# Altium PCB Audio-Player-v1.1.PcbDoc (part 1 of 3)
Units mil, origin at the board's own origin, x right, y up, seen from the top; angles counter-clockwise.
Board outline 4527.56 x 1574.8 mil, 4 copper layers (Top Layer, Ground, Power, Bottom Layer), stack 62.449 mil thick; 107 components, 72 nets, 372 pads, 147 vias.
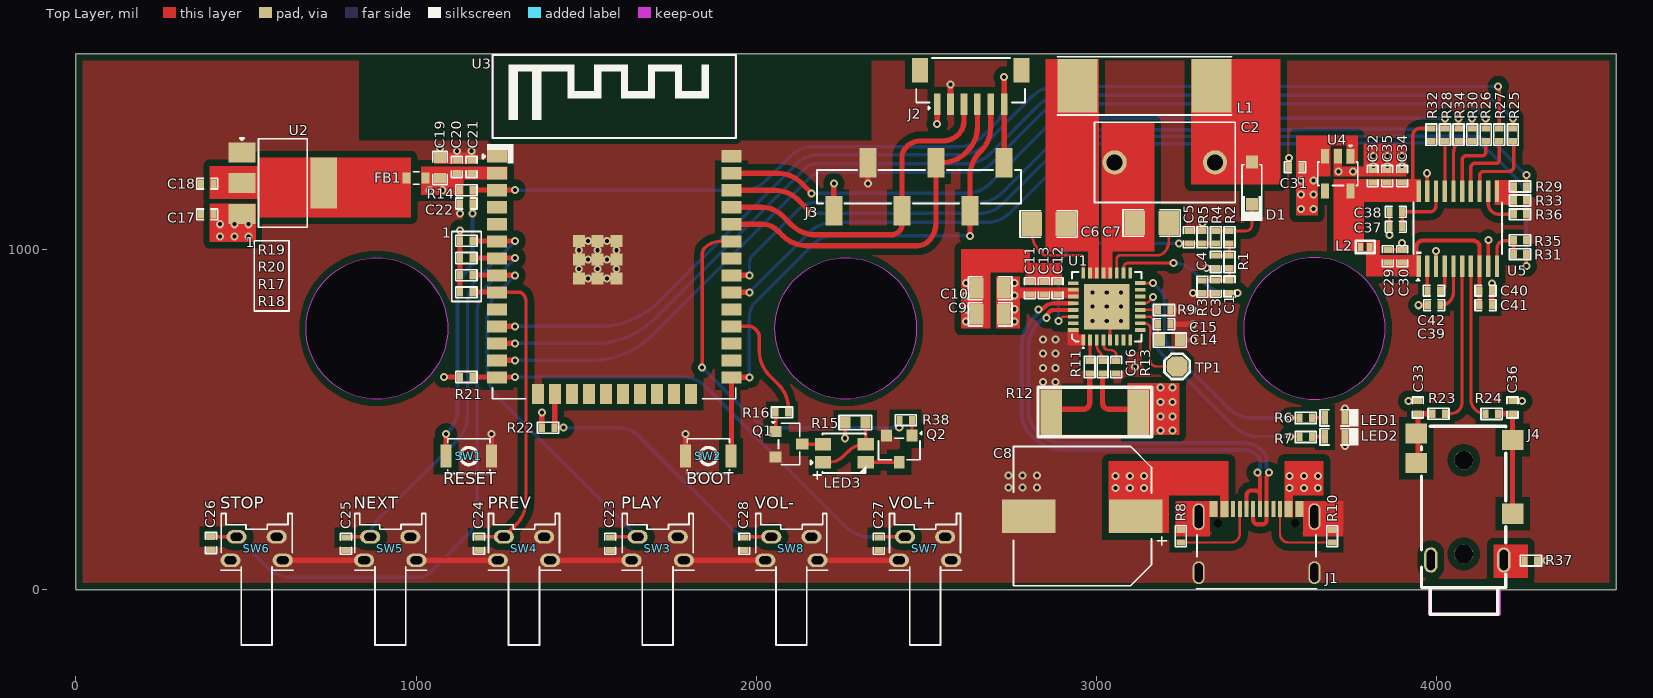
[diagram p0: Top Layer view]
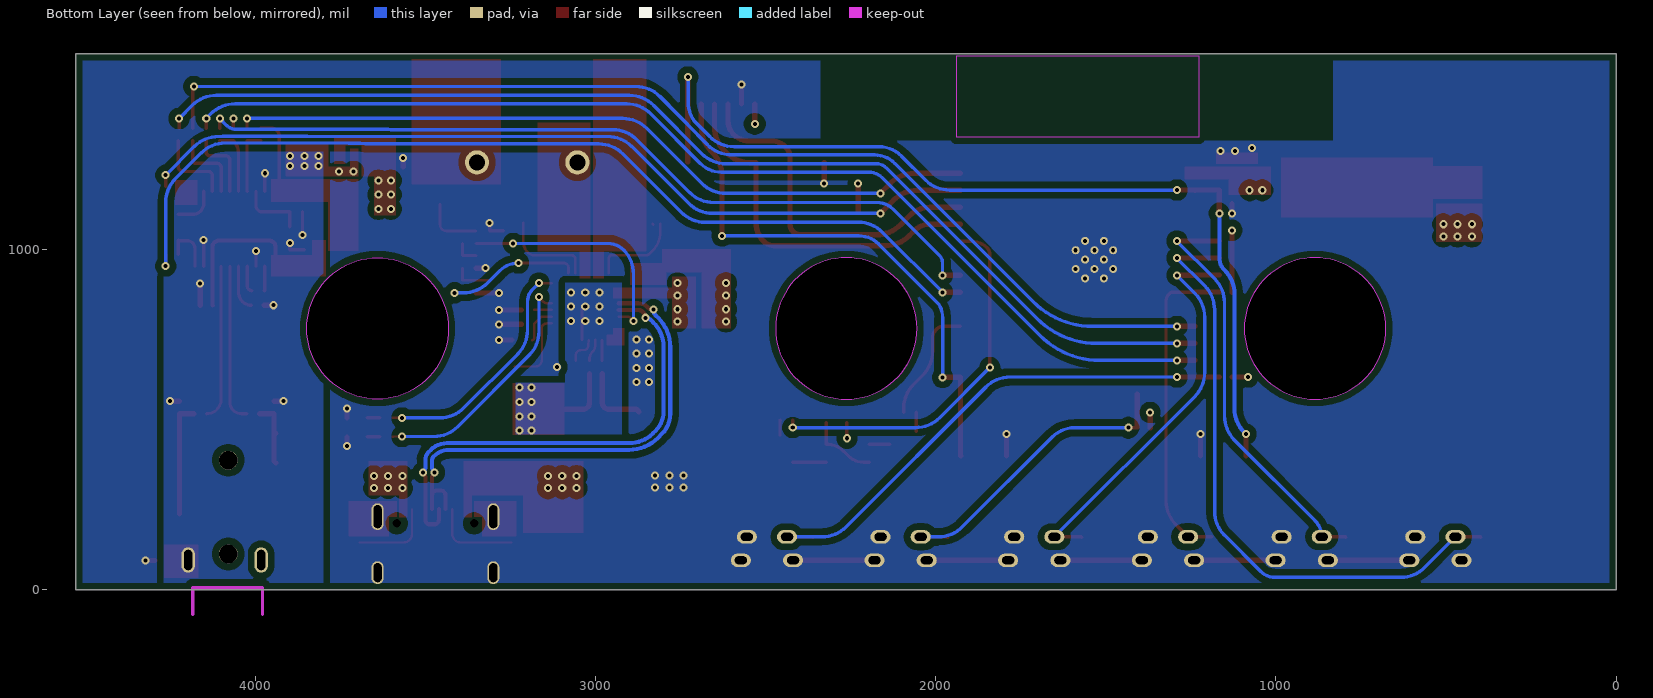
[diagram p1: Bottom Layer view, seen from below]
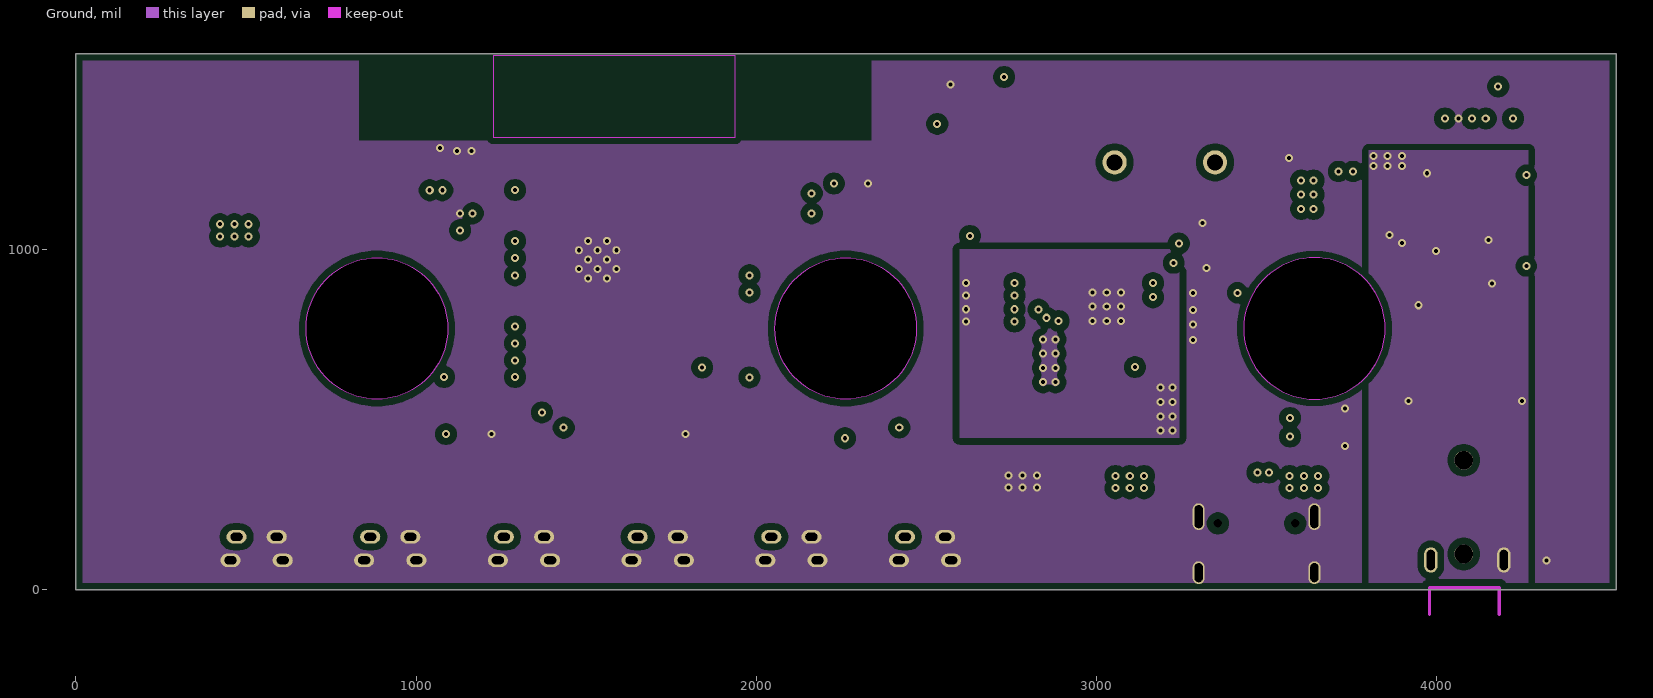
[diagram p2: Ground]
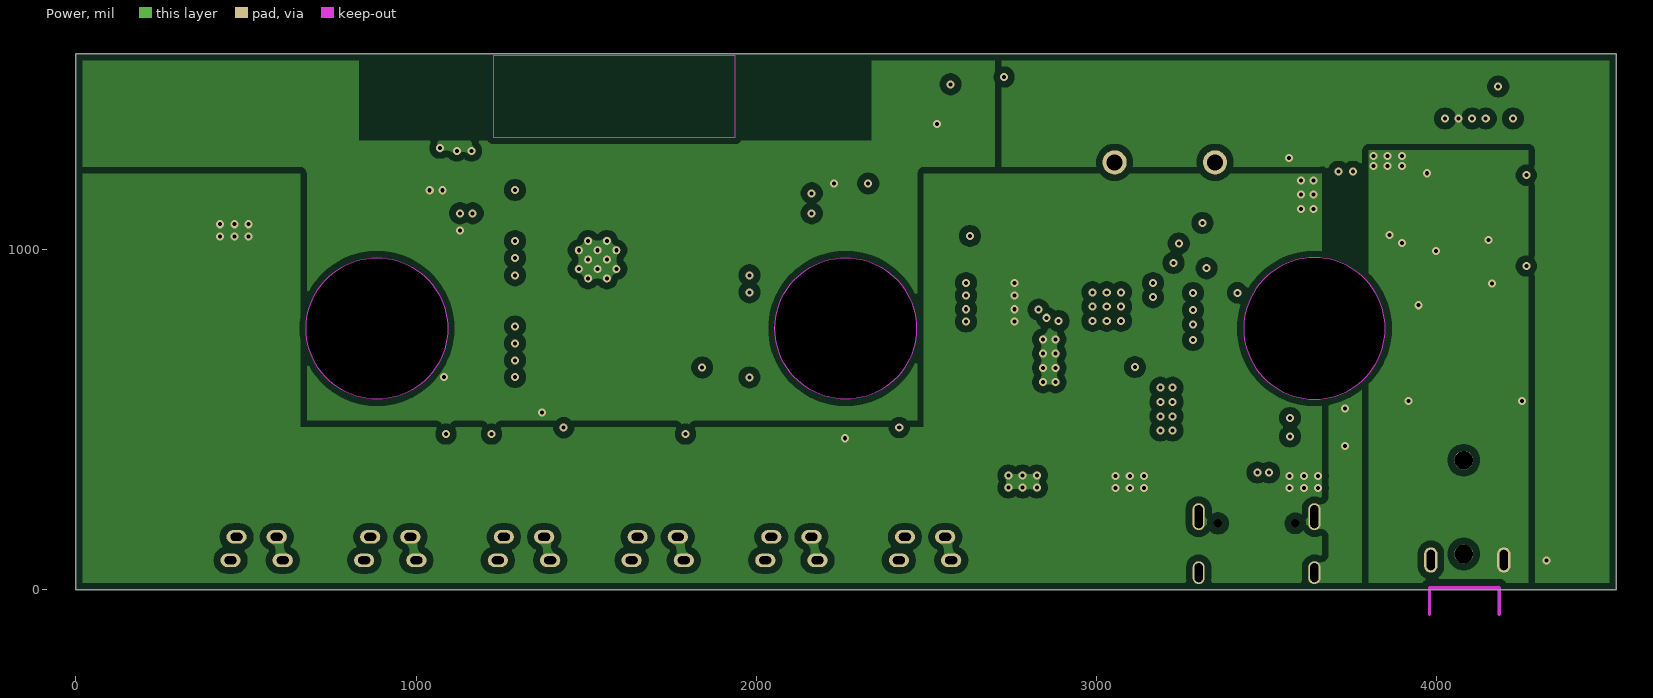
[diagram p3: Power]
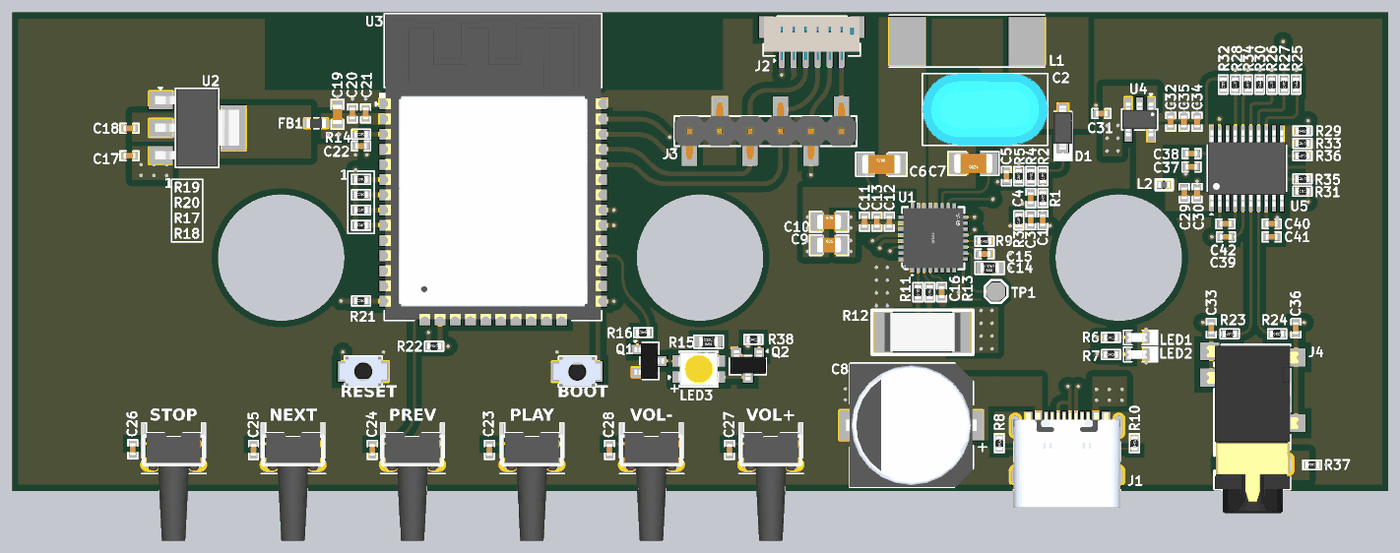
[diagram p5: 3D render of the assembled board from above, using the file's embedded part models]

## Layer stack, top to bottom
Top Solder: solder mask 0.4, Solder Resist, Dk 3.5
Top Layer: signal copper 1.378
Dielectric 2: prepreg 8.284, PP-006, Dk 4.1
Ground: signal copper 0.598
Dielectric 1: dielectric 41.929, FR-4, Dk 4.8
Power: signal copper 0.598
Dielectric 3: prepreg 8.284, PP-006, Dk 4.1
Bottom Layer: signal copper 1.378
Bottom Solder: solder mask 0.4, Solder Resist, Dk 3.5

## Board outline
0,0 4527.56,0 4527.56,1574.8 0,1574.8
cut-out: 884.97,559.66 cw(c884.97,767.66) 676.97,767.66 cw(c884.97,767.66) 884.97,975.66 cw(c884.97,767.66) 1092.97,767.66 cw(c884.97,767.66)
cut-out: 2262.92,559.66 cw(c2262.92,767.66) 2054.92,767.66 cw(c2262.92,767.66) 2262.92,975.66 cw(c2262.92,767.66) 2470.92,767.66 cw(c2262.92,767.66)
cut-out: 3432.87,767.66 ccw(c3640.87,767.66) 3640.87,559.66 ccw(c3640.87,767.66) 3848.87,767.66 ccw(c3640.87,767.66) 3640.87,975.66 ccw(c3640.87,767.66)

## Design rules (kind name [scope] priority, off if disabled: settings)
BoardOutlineClearance [All] p1: gap=0 ignorepadtopadclearanceinfootprint=FALSE except(20: Poly-OutlineEdge)
Clearance Clearance_USB [InDifferentialPairClass('USB_LINES')] p1: gap=10 ignorepadtopadclearanceinfootprint=TRUE except(0: Arc-Hole Track-Hole SMDPad-Hole THPad-Hole Via-Hole Fill-Hole Poly-Hole Region-Hole Text-Hole; 7: Arc-Arc Arc-Track Arc-SMDPad Arc-Region Track-Track Track-SMDPad Track-Region SMDPad-Region THPad-Region Via-Region Fill-Region Poly-Region Region-Region; 20: Arc-Poly Track-Poly SMDPad-Poly THPad-Poly Via-Poly Fill-Poly Poly-Poly)
Clearance [All] p2: gap=10 ignorepadtopadclearanceinfootprint=TRUE except(7: Arc-Region Track-Region SMDPad-Region THPad-Region Via-Region Fill-Region Region-Region Region-Hole; 20: Arc-Poly Track-Poly SMDPad-Poly THPad-Poly Via-Poly Fill-Poly Poly-Poly Poly-Region)
ComponentClearance [All] p1: gap=0 collisioncheckmode=3 verticalgap=0 showdistances=FALSE
DiffPairsRouting [InDifferentialPairClass('USB_LINES')] p1: maxlimit=7.6 minlimit=5 mostfreqgap=7.6 toplayer_mingap=7.6 toplayer_minwidth=12 toplayer_maxwidth=12 toplayer_prefwidth=12 midlayer1_maxgap=5 midlayer1_prefgap=5 midlayer1_minwidth=6.27 midlayer1_maxwidth=6.27 midlayer1_prefwidth=6.27 midlayer2_maxgap=5 midlayer2_prefgap=5 midlayer2_minwidth=6.27 midlayer2_maxwidth=6.27 midlayer2_prefwidth=6.27 bottomlayer_mingap=7.6 bottomlayer_minwidth=12 bottomlayer_maxwidth=12 bottomlayer_prefwidth=12 impedanceprofiledriven=TRUE impedanceprofileid={637A4964-5C93-4761-ADDB-9B271B462112} impedanceprofilevalue=90.000000 maxuncoupledlength=500
Height [All] p1: minheight=0 maxheight=2000 prefheight=500
HoleSize [All] p1: absolutevalues=TRUE maxlimit=1000 minlimit=1 maxpercent=80.000 minpercent=20.000
MinimumSolderMaskSliver [All] p1: minsoldermaskwidth=0
PolygonConnect [All] p1: connectstyle=Direct reliefconductorwidth=10 reliefentries=4 polygonreliefangle="90 Angle" airgapwidth=10
RoutingVias [All] p1: holewidth=11.81 width=23.62 viastyle="Through Hole" minholewidth=11.81 minwidth=23.62 maxholewidth=11.81 maxwidth=23.62
SilkToSilkClearance [All] p1: silktosilkclearance=0
SilkToSolderMaskClearance [IsPad] p1: minsilkscreentomaskgap=0 clearancetoexposedcopper=TRUE
SolderMaskExpansion [All] p1: expansion=4 istentingtop=FALSE
UnRoutedNet [All] p1: checkbadconnections=TRUE
Width [All] p1: maxlimit=100 minlimit=7 preferedwidth=10 minimp=50.000000 maximp=50.000000 favimp=50.000000
22 further rules are at their usual default settings.

## Classes and differential pairs
differential pair class USB_LINES: USB_D
net class USB_LINES: USB_D_P
component class Wireless-Transmitter: C1 C2 C3 C4 C5 C6 C7 C8 C9 C10 C11 C12 C13 C14 C15 C16 D1 J1 L1 LED1 LED2 R1 R2 R3 R4 R5 R6 R7 R8 R9 R10 R11 R12 R13 TP1 U1
component class Audio-DAC: C29 C30 C31 C32 C33 C34 C35 C36 C37 C38 C39 C40 C41 C42 J4 L2 R23 R24 R25 R26 R27 R28 R29 R30 R31 R32 R33 R34 R35 R36 R37 U4 U5
component class ESP32-Sheet: C17 C18 C19 C20 C21 C22 C23 C24 C25 C26 C27 C28 FB1 J2 J3 LED3 Q1 Q2 R14 R15 R16 R17 R18 R19 R20 R21 R22 R38 SW1 SW2 SW3 SW4 SW5 SW6 SW7 SW8 U2 U3
differential pair USB_D: +USB_D_P -USB_D_N

## Components (designator, comment, footprint, x,y, rotation, side; value= is the part's Value field where it differs from the comment)
C1 "15nF" Cap-0402 3391,891 r90 top
C2 "400nF" MPP404J2A0701 3201,1256 r180 top
C3 "15nF" Cap-0402 3351.2,890.7 r90 top
C4 "DNP" Cap-0402 3351.2,963.3 r90 top value=15nF
C5 "2.2nF" Cap-0402 3271.3,1035.9 r270 top
C6 "47nF" Cap-1206 2859.51,1074.9 r0 top
C7 "47nF" Cap-1206 3162.3,1077.9 r180 top
C8 "470uF" UWD-470uF-10mmDia 2958,216 r180 top
C9 "22uF" Cap-0805 2687.82,808.9 r0 top
C10 "22uF" Cap-0805 2687.82,885.7 r0 top
C11 "1uF" Cap-0402 2804.4,886 r270 top
C12 "100nF" Cap-0402 2885.62,886 r270 top
C13 "100nF" Cap-0402 2845.01,886 r270 top
C14 "100K" Res-0603 3216,733.6 r0 top
C15 "15nF" Cap-0402 3199,780 r0 top
C16 "2.2uF" Cap-0402 3058,654 r90 top
C17 "1uF" Cap-0402 386.04,1103.06 r0 top
C18 "4.7uF" Cap-0402 386.04,1193.61 r0 top
C19 "22uF" Cap-0603 1070.32,1239 r270 top
C20 "1uF" Cap-0402 1119.59,1242.5 r270 top
C21 "100nF" Cap-0402 1162.93,1242.5 r270 top
C22 "1uF" Cap-0402 1147.93,1135 r0 top
C23 "100nF" Cap-0402 1570.17,135 r90 top
C24 "100nF" Cap-0402 1185.03,135 r90 top
C25 "100nF" Cap-0402 794,135 r90 top
C26 "100nF" Cap-0402 397.07,137 r90 top
C27 "100nF" Cap-0402 2360.1,135 r90 top
C28 "100nF" Cap-0402 1965.13,135 r90 top
C29 "10uF" Cap-0402 3856.05,980.04 r270 top
C30 "100nF" Cap-0402 3898.55,980.04 r270 top
C31 "10uF" Cap-0402 3584,1242 r0 top
C32 "10uF" Cap-0402 3811.65,1215.47 r270 top
C33 "2.2nF" Cap-0402 3945,535.5 r270 top
C34 "10uF" Cap-0402 3898.55,1215.47 r270 top
C35 "100nF" Cap-0402 3855.1,1215.47 r270 top
C36 "2.2nF" Cap-0402 4223.14,535.5 r270 top
C37 "10uF" Cap-0402 3880.05,1066.37 r0 top
C38 "100nF" Cap-0402 3880.05,1110.38 r0 top
C39 "2.2uF" Cap-0402 3991.98,879 r0 top
C40 "100nF" Cap-0402 4143.82,879 r180 top
C41 "10uF" Cap-0402 4143.82,836 r180 top
C42 "2.2uF" Cap-0402 3993,836 r180 top
D1 "1N5819HW-7-F" SOD-123 3457,1195 r270 top
FB1 "BLM18PG221SN1D" "IND-0603 (1608 Metric)" 1000.05,1210 r0 top value=100mR
J1 "TYPE-C-31-M-12" TYPE-C-31-M-12_ 3470.63,143.31 r0 top
J2 "Voltlink Target" "Voltlink Target" 2630.3,1477 r0 top
J3 "X6511WVS-06H-C60D48R2" X6511WVS-06H-C60D48R2 2478,1184.13 r0 top
J4 "PJ-332A-6A" PJ-332A-6A 4081.51,273.12 r90 top
L1 "6.3uH" YX-A11-R501000-R0807 3141,1481 r0 top
L2 "BLM15AG601SN1D" IND-0402 3790,1007.54 r0 top
LED1 "RED" LED-0603 3701,505 r0 top
LED2 "Emerald" LED-0603 3701,449 r0 top
LED3 "A-SC6302R6AGHC-A03-2T" A-SC6302R6AGHC-A03-2T 2258.91,401.12 r180 top
Q1 "AO3400A" sot-23 2096.13,427.7 r270 top
Q2 "AO3400A" sot-23 2420.33,413.92 r180 top
R1 "3.3K" Res-0402 3391,963.45 r90 top
R2 "0R" Res-0402 3391,1035.9 r90 top
R3 "33K" Res-0402 3311.4,890.5 r90 top
R4 "100K" Res-0402 3351.2,1035.9 r90 top
R5 "10K" Res-0402 3311.4,1035.9 r270 top
R6 "1K" Res-0402 3615,505 r0 top
R7 "1K" Res-0402 3615,449 r0 top
R8 "5.1K" Res-0402 3247.68,157 r90 top
R9 "100K" Res-0402 3199,822 r0 top
R10 "5.1K" Res-0402 3692.68,157 r90 top
R11 "0R" Res-0402 2980,654 r90 top
R12 "20mR" RES-2512 2995,522 r180 top
R13 "0R" Res-0402 3018,654 r90 top
R14 "10K" Res-0402 1147.93,1174 r180 top
R15 "470R" Res-0603 2291.31,491.02 r0 top
R16 "1K" Res-0402 2075.5,521 r180 top
R17 "10K" Res-0402 1147.93,924.38 r180 top
R18 "10K" Res-0402 1147.93,873.85 r180 top
R19 "10K" Res-0402 1147.93,1025.44 r180 top
R20 "10K" Res-0402 1147.93,974.91 r180 top
R21 "10K" Res-0402 1147.93,625 r180 top
R22 "10K" Res-0402 1388.19,476 r180 top
R23 "470R" Res-0402 4005.64,517 r180 top
R24 "470R" Res-0402 4161.64,517 r0 top
R25 "0R" Res-0402 4224.26,1337.5 r90 top
R26 "0R" Res-0402 4144.36,1337.5 r90 top
R27 "0R" Res-0402 4184.31,1337.5 r90 top
R28 "0R" Res-0402 4024.5,1337.5 r90 top
R29 "0R" Res-0402 4245.05,1185 r0 top
R30 "0R" Res-0402 4104.41,1337.5 r90 top
R31 "0R" Res-0402 4245.05,986.17 r0 top
R32 "10K" Res-0402 3984.55,1337.5 r270 top
R33 "10K" Res-0402 4245.05,1144 r180 top
R34 "10K" Res-0402 4064.45,1337.5 r270 top
R35 "10K" Res-0402 4245.05,1027.25 r180 top
R36 "10K" Res-0402 4245.05,1103 r180 top
R37 "0R" Res-0402 4277.24,85.32 r180 top
R38 "1K" Res-0402 2439.13,498.35 r0 top
SW1 "B3U-1000P" B3U-1000P 1155.11,392.61 r180 top
SW2 "B3U-1000P" B3U-1000P 1859.25,392.61 r0 top
SW3 "GT-TB092B-H090-L1" GT-TB092B-H090-L1 1710.23,120.71 r0 top
SW4 "GT-TB092B-H090-L1" GT-TB092B-H090-L1 1317.23,120.71 r0 top
SW5 "GT-TB092B-H090-L1" GT-TB092B-H090-L1 924.23,120.71 r0 top
SW6 "GT-TB092B-H090-L1" GT-TB092B-H090-L1 531.23,120.71 r0 top
SW7 "GT-TB092B-H090-L1" GT-TB092B-H090-L1 2496.23,120.71 r0 top
SW8 "GT-TB092B-H090-L1" GT-TB092B-H090-L1 2103.23,120.71 r0 top
TP1 "TEST POINT" Test-point 3237,656 r0 top
U1 "IP6806_NF" QFN-32-EP(5x5) 3030.31,832.02 r90 top
U2 "LDL1117S33R" "SOT- 223" 608.74,1195.01 r270 top
U3 "ESP32-WROOM-32E-N16" "38-SMD Module" 1582.6,924.39 r0 top
U4 "AP2127K-3.3TRG1" SOT-23-5 3709.48,1222.65 r270 top
U5 "PCM5102APWR" TSSOP-20 4062.26,1061.24 r90 top

## Footprints (in the part's own frame and the unit in brackets; to place one, negate y for a bottom-side part, rotate by r counter-clockwise, add the part's x,y. Pads: shape width x height; smd on the part's side, far side on the other; paste and mask are expansions set on the pad)
"38-SMD Module" [mm]
  rect 1.5x0.9 smd: 1(-8.75,8.88) 2(-8.75,7.61) 3(-8.75,6.34) 4(-8.75,5.07) 5(-8.75,3.8) 6(-8.75,2.53) 7(-8.75,1.26) 8(-8.75,-0.01) 9(-8.75,-1.28) 10(-8.75,-2.55) 11(-8.75,-3.82) 12(-8.75,-5.09) 13(-8.75,-6.36) 14(-8.75,-7.63) 25(8.75,-7.63) 26(8.75,-6.36) 27(8.75,-5.09) 28(8.75,-3.82) 29(8.75,-2.55) 30(8.75,-1.28) 31(8.75,-0.01) 32(8.75,1.26) 33(8.75,2.53) 34(8.75,3.8) 35(8.75,5.07) 36(8.75,6.34) 37(8.75,7.61) 38(8.75,8.88)
  rect 0.9x1.5 smd: 15(-5.71,-8.88) 16(-4.44,-8.88) 17(-3.17,-8.88) 18(-1.9,-8.88) 19(-0.63,-8.88) 20(0.64,-8.88) 21(1.91,-8.88) 22(3.18,-8.88) 23(4.45,-8.88) 24(5.72,-8.88)
  rect 0.9x0.9 smd: 39(-2.65,2.56) 40(-1.25,2.56) 41(0.15,2.56) 42(-2.65,1.16) 43(-1.25,1.16) 44(0.15,1.16) 45(-2.65,-0.24) 46(-1.25,-0.24) 47(0.15,-0.24)
  round 0.6 hole 0.3 mask+0: 39_11(-2.65,0.46) 39_11(-2.65,1.86) 39_11(-1.95,1.16) 39_11(-1.95,2.56) 39_11(-1.25,0.46) 39_11(-1.25,1.86) 39_11(-0.55,-0.24) 39_11(-0.55,1.16) 39_11(-0.55,2.56) 39_11(0.15,0.46) 39_11(0.15,1.86) 39_20(-1.95,-0.24)
  Keep-Out Layer region: -9.042,10.287 9.042,10.287 9.042,16.383 -9.042,16.383
  silkscreen extent -9.8,-9.22 9.09,16.43, body extent -9,-9.12 9,16.38, height 3.25
A-SC6302R6AGHC-A03-2T [mm]
  rect 1.2x0.95 smd paste+0 mask+0.05: 1(1.6,0.675) 2(1.6,-0.675) 3(-1.6,-0.675) 4(-1.6,0.675)
  silkscreen extent -1.63,-1.48 2.51,1.93, body extent -1.75,-1.4 1.75,1.4, height 1.85
B3U-1000P [mm] "SWITCH TACTILE SPST-NO 0.05A 12V"
  rect 0.82x1.72 smd: 1(-1.7,0) 2(1.7,0)
  silkscreen extent -1.57,-1.3 1.57,1.3, body extent -2,-1.26 2,1.24, height 1.6
Cap-0402 [mil]
  rect 18x25 smd mask+2.36: 1(-18.5,0) 2(18.5,0)
  silkscreen extent -31,-16 31,16, body extent -20,-10 20,10, height 19
Cap-0603 [mil]
  rect 30x35 smd mask+2.36: 1(-30,0) 2(30,0)
  silkscreen extent -49,-21 49,21, body extent -32,-16 31,16, height 34
Cap-0805 [mil] "SMD 0805"
  rect 40x60 smd mask+2.76: 1(-40,0) 2(40,0)
  silkscreen extent -64,-34 64,34, body extent -39,-25 39,25, height 30
Cap-1206 [mil] "SMD 1206"
  rect 60x70 smd: 1(-50,0) 2(50,0)
  silkscreen extent -84,-39 84,39, body extent -63,-31 63,32, height 39
GT-TB092B-H090-L1 [mm]
  oval 1.5x1 hole 0.6 slot 0.9 at 0 deg: 1(-1.5,0.875) 2(1.5,0.875) 3(-1.95,-0.875) 4(1.95,-0.875)
  silkscreen extent -2.66,-7.21 2.72,2.63, body extent -2.66,-7.24 2.66,2.66, height 5.02
IND-0402 [mm]
  rect 0.4x0.6 smd: 1(-0.35,0) 2(0.35,0)
  silkscreen extent -0.71,-0.46 0.71,0.46, body extent -0.5,-0.25 0.5,0.25, height 0.25
"IND-0603 (1608 Metric)" [mm] "0.063\" L x 0.032\" W (1.60mm x 0.80mm)"
  rect 0.6x0.8 smd: 1(-0.7,0) 2(0.7,0)
  silkscreen extent -0.2,-0.46 0.23,0.46, body extent -0.8,-0.4 0.8,0.4, height 0.78
LED-0603 [mm]
  rect 0.5x1 smd: 1(-0.75,0) 2(0.75,0)
  silkscreen extent -1.12,-0.66 1.75,0.66, body extent -0.82,-0.37 0.82,0.36, height 0.68
MPP404J2A0701 [mm]
  round 1.8 hole 1.2 paste-2539.97 mask+0.051: 1(-3.75,0) 2(3.75,0)
  silkscreen extent -5.25,-3 5.25,3, body extent -5.25,-3 5.25,3, height 9.5
PJ-332A-6A [mm]
  oval 1.9x1 hole 0.6 slot 1.5 at 0 deg paste-2539.97 mask+0.05: 1(-4.725,-2.95) 2(-4.725,2.5)
  rect 1.5x1.6 smd paste+0 mask+0.05: 3(-1.275,-3.6) 4(2.525,3.6) 5(4.225,-3.6) 6(4.725,3.6)
  round 1.4 hole 1.4 unplated paste-2539.97: ""(-4.275,0.05) ""(2.725,0.05)
  Keep-Out Layer lines w0.254: -8.763,2.6 -6.775,2.6 -6.775,-2.6 -8.763,-2.6
  silkscreen extent -8.78,-3.1 5.26,3.2, body extent -8.79,-3.85 5.22,3.85, height 4.75
QFN-32-EP(5x5) [mm]
  rect 0.8x0.28 smd paste-100 mask+0.05: 1(-2.5,1.75) 2(-2.5,1.251) 3(-2.5,0.751) 4(-2.5,0.251) 5(-2.5,-0.249) 6(-2.5,-0.749) 7(-2.5,-1.249) 8(-2.5,-1.749) 17(2.5,-1.752) 18(2.5,-1.251) 19(2.5,-0.752) 20(2.5,-0.251) 21(2.5,0.248) 22(2.5,0.749) 23(2.5,1.248) 24(2.5,1.749)
  rect 0.28x0.8 smd paste-100 mask+0.05: 9(-1.748,-2.5) 10(-1.248,-2.5) 11(-0.748,-2.5) 12(-0.248,-2.5) 13(0.252,-2.5) 14(0.752,-2.5) 15(1.252,-2.5) 16(1.752,-2.5) 25(1.75,2.5) 26(1.25,2.5) 27(0.75,2.5) 28(0.25,2.5) 29(-0.25,2.5) 30(-0.75,2.5) 31(-1.25,2.5) 32(-1.75,2.5)
  rect 3.4x3.4 smd paste-100 mask+0.05: 33(0,0)
  silkscreen extent -3.11,-2.6 2.6,2.6, body extent -2.51,-2.51 2.51,2.51, height 0.93
Res-0402 [mil]
  rect 18x25 smd mask+2.17: 1(-18.5,0) 2(18.5,0)
  silkscreen extent -32,-17 32,16, body extent -23,-11 23,11, height 16
Res-0603 [mil]
  rect 30x35 smd: 1(-30,0) 2(30,0)
  silkscreen extent -48,-21 48,21, body extent -31,-17 31,17, height 18
RES-2512 [mm]
  rect 1.6x3.4 smd: 1(-3.25,0) 2(3.25,0)
  silkscreen extent -4.24,-1.85 4.24,1.85, body extent -3.17,-1.63 3.18,1.63, height 0.58
SOD-123 [mm]
  rect 0.95x0.9 smd: 1(-1.575,0) 2(1.575,0)
  silkscreen extent -1.37,-0.8 2.82,0.8, body extent -1.82,-0.78 1.83,0.78, height 1.5
sot-23 [mm] "TRANS NPN 40V 0.6A SOT23"
  rect 0.82x0.92 smd: 1(-0.95,-1) 2(0.95,-1) 3(0,1)
  silkscreen extent -1.68,-1.3 1.55,0.81, body extent -1.5,-1.25 1.5,1.25, height 1.05
SOT-23-5 [mm]
  rect 1.1x0.6 smd: 1(-1.3,0.95) 2(-1.3,0) 3(-1.3,-0.95) 4(1.3,-0.95) 5(1.3,0.95)
  silkscreen extent -2.13,-1.5 0.88,1.5, body extent -1.4,-1.45 1.4,1.45, height 1.45
"SOT- 223" [mm]
  rect 1.5x2 smd: 1(-2.3,-3.05) 2(0,-3.05) 3(2.3,-3.05)
  rect 3.8x2 smd: 4(0,3.05)
  silkscreen extent -3.35,-3.2 3.3,1.8, body extent -3.25,-3.5 3.25,3.5, height 1.61
Test-point [mil]
  oct 60x60 smd: 1(0,0)
  silkscreen extent -37,-37 37,37
TSSOP-20 [mm]
  rect 1.6x0.32 smd: 1(-2.8,2.925) 2(-2.8,2.275) 3(-2.8,1.625) 4(-2.8,0.975) 5(-2.8,0.325) 6(-2.8,-0.325) 7(-2.8,-0.975) 8(-2.8,-1.625) 9(-2.8,-2.275) 10(-2.8,-2.925) 11(2.8,-2.925) 12(2.8,-2.275) 13(2.8,-1.625) 14(2.8,-0.975) 15(2.8,-0.325) 16(2.8,0.325) 17(2.8,0.975) 18(2.8,1.625) 19(2.8,2.275) 20(2.8,2.925)
  silkscreen extent -3.88,-3.3 1.95,3.3, body extent -3.2,-3.25 3.2,3.25, height 1.2
TYPE-C-31-M-12_ [mm]
  rect 0.6x1.2 smd: A1/B12(-3.2,2.375) A4/B9(-2.4,2.375) B1/A12(3.2,2.375) B4/A9(2.4,2.375)
  rect 0.3x1.2 smd: A5(-1.25,2.375) A6(-0.25,2.375) A7(0.25,2.375) A8(1.25,2.375) B5(1.75,2.375) B6(0.75,2.375) B7(-0.75,2.375) B8(-1.75,2.375)
  round 0 hole 0.62 unplated: MH(-2.89,1.305) MH(2.89,1.305)
  oval 0.9x2 hole 0.6 slot 1.7 at 90 deg: S1(4.325,1.805) S4(-4.325,1.805)
  oval 0.9x1.7 hole 0.6 slot 1.4 at 90 deg: S2(4.325,-2.375) S3(-4.325,-2.375)
  silkscreen extent -4.5,-3.57 4.5,0.44, body extent -4.47,-5.01 4.47,2.89, height 3.31
UWD-470uF-10mmDia [mm] "0.406\" L x 0.406\" W (10.30mm x 10.30mm)"
  rect 4x2.5 smd: 1(-4,0) 2(4,0)
  silkscreen extent -6.3,-5.21 5.13,5.21, body extent -5.45,-5.15 5.45,5.15, height 10.8
"Voltlink Target" [mm]
  rect 0.5x1.6 smd: 1(-2.5,-1.262) 2(-1.5,-1.262) 3(-0.5,-1.262) 4(0.5,-1.262) 5(1.5,-1.262) 6(2.5,-1.262)
  rect 1.2x1.8 smd: MP1(-3.8,1.262) MP2(3.8,1.262)
  silkscreen extent -4.06,-1.68 4.06,2.17, body extent -4,-1.49 4,2.11, height 4.25
X6511WVS-06H-C60D48R2 [mm]
  rect 1.27x2.2 smd paste+0 mask+0.051: 1(-6.35,-1.8) 2(-3.81,1.8) 3(-1.27,-1.8) 4(1.27,1.8) 5(3.81,-1.8) 6(6.35,1.8)
  silkscreen extent -7.62,-1.25 7.62,1.25, body extent -7.62,-2.4 7.62,2.4, height 9.14
YX-A11-R501000-R0807 [mm]
  rect 3x4 smd: 1(-5,0) 2(5,0)
  silkscreen extent -6.5,-2.18 6.5,2.18

## Part data
C1 C3 C4 C15: library part CC0402KRX7R9BB153, "CAP CER 0.015UF 50V X7R 0402", Case/Package=0402, Dielectric=X7R, LCSC Part Number=C114405, Manufacturer=Yageo, Max Operating Temperature=125°C, Min Operating Temperature=-55°C, Supplier Part Number=1105976, Tolerance=10%, Voltage Rating=50V, Category="Ceramic Capacitors", ComponentLink1Description=https://datasheet.octopart.com/CC0402KRX7R9BB153-Yageo-datasheet-166511530.pdf?src-supplier=Future+Electronics, ComponentLink1URL=https://datasheet.octopart.com/CC0402KRX7R9BB153-Yageo-datasheet-166511530.pdf?src-supplier=Future+Electronics, ComponentLink2Description=https://datasheet.octopart.com/CC0402KRX7R9BB153-Yageo-datasheet-147453679.pdf?src-supplier=Newark, ComponentLink2URL=https://datasheet.octopart.com/CC0402KRX7R9BB153-Yageo-datasheet-147453679.pdf?src-supplier=Newark, ComponentLink3Description=http://www.yageo.com/documents/recent/UPY-GPHC_X7R_6.3V-to-50V_18.pdf?src-supplier=Digi-Key, ComponentLink3URL=http://www.yageo.com/documents/recent/UPY-GPHC_X7R_6.3V-to-50V_18.pdf?src-supplier=Digi-Key, ComponentLink4Description=https://www.yageo.com/upload/media/product/productsearch/datasheet/mlcc/UPY-GPHC_X7R_6.3V-to-50V_18.pdf?src-supplier=Digi-Key, ComponentLink4URL=https://www.yageo.com/upload/media/product/productsearch/datasheet/mlcc/UPY-GPHC_X7R_6.3V-to-50V_18.pdf?src-supplier=Digi-Key, ComponentLink5Description=https://datasheet.octopart.com/CC0402KRX7R9BB153-Yageo-datasheet-151948686.pdf?src-supplier=Farnell, ComponentLink5URL=https://datasheet.octopart.com/CC0402KRX7R9BB153-Yageo-datasheet-151948686.pdf?src-supplier=Farnell, ComponentLink6Description=http://www.yageo.com/exep/pages/download/literatures/ProductSelectionGuide%202014_Final_2.pdf?src-supplier=Digi-Key, ComponentLink6URL=http://www.yageo.com/exep/pages/download/literatures/ProductSelectionGuide%202014_Final_2.pdf?src-supplier=Digi-Key, Halogen Free="Halogen Free", Item Type=Capacitor, Lead Free="Lead Free", Length=0.039inch, Manufacturer Part Number=CC0402KRX7R9BB153, Mounting Technology="Surface Mount", Packaging="Tape and Reel", Pricing="10000=0.0032, 40000=0.0031, 150000=0.0029, 250000=0.0028, 500000=0.0027 (USD)", RoHS=Yes, RoHS Compliant=Yes, Series=CC, Stock=10000, Supplier="Future Electronics", Thickness=0.022inch, Voltage Rating (DC)=50V, Width=0.02inch
C2: library part MPP404J2A0701, "400nF -40℃~+105℃ ±5% 100V Plugin,P=7.5mm Polypropylene Film Capacitors (CBB) ROHS", LCSC Part Number=C484926, Manufacturer=KYET, Package=Plugin,P=7.5mm, ComponentLink1Description=LCSC, ComponentLink1URL=https://lcsc.com/product-detail/Polypropylene-Film-Capacitors-CBB_KYET-MPP404J2A0701_C484926.html, Item Type=Capacitor, Manufacturer Part Number=MPP404J2A0701
C5 C33 C36: library part CC0402JRX7R9BB222, "CAP CER 2200PF 50V X7R 0402", LCSC Part Number=C513667, Manufacturer=Yageo, Voltage Rating (DC)=50V, ComponentLink1Description=https://datasheet.ciiva.com/26862/getdatasheetpartid-662944-26862614.pdf?src-supplier=Verical, ComponentLink1URL=https://datasheet.ciiva.com/26862/getdatasheetpartid-662944-26862614.pdf?src-supplier=Verical, ComponentLink2Description=https://datasheet.ciiva.com/17071/upy-gphc-x7r-6-3v-to-50v-8-17071077.pdf?src-supplier=Future+Electronics, ComponentLink2URL=https://datasheet.ciiva.com/17071/upy-gphc-x7r-6-3v-to-50v-8-17071077.pdf?src-supplier=Future+Electronics, ComponentLink3Description=https://datasheet.ciiva.com/13174/upy-gphc-x7r-6-3v-to-50v-8-12304-13174552.pdf?src-supplier=Mouser, ComponentLink3URL=https://datasheet.ciiva.com/13174/upy-gphc-x7r-6-3v-to-50v-8-12304-13174552.pdf?src-supplier=Mouser, Halogen Free=5694HalogenFree, Item Type=Capacitors, Lead Free=5697LeadFree, Manufacturer Part Number=CC0402JRX7R9BB222, Pricing="10000=0.0017, 30000=0.0016, 50000=0.0016, 200000=0.0015, 300000=0.0015 (USD)", RoHS=Yes, Stock=10000, Supplier="Future Electronics"
C6 C7: library part CC1206JRX7R0BB473, "CAP CER 0.047UF 100V X7R 1206", Case Code (Imperial)=1206, Case Code (Metric)=3216, Dielectric=X7R, LCSC Part Number=C577197, Manufacturer=Yageo, Max Operating Temperature=125°C, Min Operating Temperature=-55°C, Resistor Type=Ceramic, Tolerance=5%, Voltage Rating=100V, Capacitance=47nF, Case/Package=1206, Category="Ceramic Capacitors", ComponentLink1Description=https://datasheet.ciiva.com/11465/upy-np0x7r-mv-100-to-630v-9-11465413.pdf?src-supplier=Avnet, ComponentLink1URL=https://datasheet.ciiva.com/11465/upy-np0x7r-mv-100-to-630v-9-11465413.pdf?src-supplier=Avnet, ComponentLink2Description=https://datasheet.ciiva.com/13210/upy-gp-np0-16v-to-50v-8-13210277.pdf?src-supplier=Mouser, ComponentLink2URL=https://datasheet.ciiva.com/13210/upy-gp-np0-16v-to-50v-8-13210277.pdf?src-supplier=Mouser, Construction=Flat, Depth=1.6mm, Height=0.85mm, Item Type=Capacitor, Length=3.2mm, Manufacturer Part Number=CC1206JRX7R0BB473, Mount="Surface Mount", Packaging="Tape and Reel", Pricing 1="1=0.21620, 10=0.10530, 25=0.10420, 100=0.08480, 250=0.08390, 500=0.05860, 1000=0.05090, 3000=0.04900, 6000=0.02930 (USD)", Radiation Hardening=No, RoHS=Yes, RoHS Compliant=Yes, Series=CC, Stock 1=6600, Supplier 1="Arrow Electronics", Supplier Part Number 1=CC1206JRX7R0BB473, Termination=SMD/SMT, Thickness=0.037inch, Voltage Rating (DC)=100V, Width=1.6mm
C8: library part UWD1E471MCL1GS, "CAP ALUM 470UF 20% 25V SMD", Case/Package=SMD/SMT, LCSC Part Number=C251022, Leakage Current=52.8uA, Manufacturer=Nichicon, Max Operating Temperature=105°C, Min Operating Temperature=-55°C, Package Quantity=1, Ripple Current=670mA, Supplier Part Number 1=493-9671-1-ND, Tolerance=20%, Voltage=25V, Capacitance=470uF, Category="Aluminum Electrolytic Capacitors", ComponentLink1Description=https://datasheet.ciiva.com/11783/0900766b8080ae55-11783126.pdf?src-supplier=RSComponents, ComponentLink1URL=https://datasheet.ciiva.com/11783/0900766b8080ae55-11783126.pdf?src-supplier=RSComponents, ComponentLink2Description=https://datasheet.ciiva.com/17523/e-wd-17523158.pdf?src-supplier=Avnet+Europe, ComponentLink2URL=https://datasheet.ciiva.com/17523/e-wd-17523158.pdf?src-supplier=Avnet+Europe, ComponentLink3Description=https://datasheet.ciiva.com/11684/e-wd-11684711.pdf?src-supplier=Avnet, ComponentLink3URL=https://datasheet.ciiva.com/11684/e-wd-11684711.pdf?src-supplier=Avnet, ComponentLink4Description=https://datasheet.ciiva.com/5362/e-wd-5362606.pdf?src-supplier=Mouser, ComponentLink4URL=https://datasheet.ciiva.com/5362/e-wd-5362606.pdf?src-supplier=Mouser, ComponentLink5Description=https://datasheet.ciiva.com/16512/e-wd-16512734.pdf?src-supplier=Future+Electronics, ComponentLink5URL=https://datasheet.ciiva.com/16512/e-wd-16512734.pdf?src-supplier=Future+Electronics, ComponentLink6Description=https://datasheet.ciiva.com/15036/e-wd-15036959.pdf?src-supplier=Digi-Key, ComponentLink6URL=https://datasheet.ciiva.com/15036/e-wd-15036959.pdf?src-supplier=Digi-Key, ComponentLink7Description=https://datasheet.ciiva.com/41751/404632-da-01-en-smd-aluminium-kondensator-470uf-25v-41751238.pdf?src-supplier=Conrad, ComponentLink7URL=https://datasheet.ciiva.com/41751/404632-da-01-en-smd-aluminium-kondensator-470uf-25v-41751238.pdf?src-supplier=Conrad, Construction=Cylindrical, Contact Plating=Tin, Diameter=10mm, Dissipation Factor=0.16%, Features="General Purpose", Height=10mm, Height - Seated (Max)=0.394inch, Impedance=90mR, Item Type=Capacitor, Lead Free="Lead Free", Lead Pitch=4.5mm, Length=10mm, Life (Hours)=5000Hour, Manufacturer Part Number=UWD1E471MCL1GS, Material=Aluminium, Mount="Surface Mount", Packaging="Tape and Reel", Pricing 1="1=0.87000, 10=0.64000, 50=0.51200, 100=0.43880 (USD)", Radiation Hardening=No, RoHS=Yes, RoHS Compliant=Yes, Series=WD, Supplier 1=Digi-Key, Termination=SMD/SMT, Voltage Rating=25V, Voltage Rating (DC)=25V
C9 C10: library part CC0805MKX5R8BB226, "CAP CER 22UF 25V X5R 0805", Case Code (Imperial)=0805, Case Code (Metric)=2012, Dielectric=X5R, LCSC Part Number=C784585, Manufacturer=Yageo, Max Operating Temperature=85°C, Min Operating Temperature=-55°C, Package Quantity=3000, Supplier Part Number 1=311-1903-1-ND, Tolerance=20%, Voltage Rating=25V, Capacitance=22uF, Case/Package=0805, Category="Ceramic Capacitors", ComponentLink1Description=http://www.mouser.com/ds/2/447/Yageo_UPY-GP_NP0_16V-to-50V_9-358835.pdf?src-supplier=Mouser, ComponentLink1URL=http://www.mouser.com/ds/2/447/Yageo_UPY-GP_NP0_16V-to-50V_9-358835.pdf?src-supplier=Mouser, ComponentLink2Description=http://www.yageo.com/documents/recent/UPY-GPHC_X5R_4V-to-50V_25.pdf?src-supplier=Digi-Key, ComponentLink2URL=http://www.yageo.com/documents/recent/UPY-GPHC_X5R_4V-to-50V_25.pdf?src-supplier=Digi-Key, Halogen Free="Halogen Free", Height=1.25mm, Item Type=Capacitor, Lead Free="Lead Free", Length=0.079inch, Manufacturer Part Number=CC0805MKX5R8BB226, Mount="Surface Mount", Packaging="Tape and Reel", Pricing 1="1=0.47000, 10=0.33300, 50=0.25140, 100=0.21900, 500=0.16222, 1000=0.13789 (USD)", RoHS=Yes, RoHS Compliant=Yes, Stock 1=64970, Supplier 1=Digi-Key, Termination=SMD/SMT, Thickness=0.057inch, Voltage Rating (DC)=25V, Weight=0.000194oz, Width=0.049inch
C11 C17 C20 C22: library part CC0402KRX5R7BB105, "CAP CER 1UF 16V X5R 0402", Case Code (Imperial)=0402, Case Code (Metric)=1005, Dielectric=X5R, LCSC Part Number=C325464, Manufacturer=Yageo, Max Operating Temperature=85°C, Min Operating Temperature=-55°C, Supplier Part Number 1=311-1691-6-ND, Tolerance=10%, Voltage Rating=16V, Capacitance=1uF, Case/Package=0402, ComponentLink1Description=http://www.yageo.com/documents/recent/UPY-GPHC_X5R_4V-to-50V_12.pdf?src-supplier=Avnet+Europe, ComponentLink1URL=http://www.yageo.com/documents/recent/UPY-GPHC_X5R_4V-to-50V_12.pdf?src-supplier=Avnet+Europe, Composition=Ceramic, Depth=0.5mm, Halogen Free="Halogen Free", Height=0.5mm, Item Type=Capacitor, Lead Free="Lead Free", Length=1mm, Manufacturer Part Number=CC0402KRX5R7BB105, Mount="Surface Mount", Packaging="Tape and Reel", Pricing 1="1=0.36, 10=0.252, 100=0.1512, 500=0.1134, 1000=0.09576, 2500=0.09072, 5000=0.08568 (USD)", Radiation Hardening=No, Stock 1=1405667, Supplier 1=Digi-Key, Termination=SMD/SMT, Thickness=0.022inch, Voltage Rating (DC)=16V, Weight=2.3E-05oz, Width=0.02inch
C12 C13 C21 C23 C24 C25 C26 C27 C28 C30 C35 C38 C40: library part GRM155R71H104KE14D, "CAP CER 0.1UF 50V X7R 0402", Case Code (Imperial)=0402, Case Code (Metric)=1005, Dielectric=X7R, Dielectric Material=Ceramic, LCSC Part Number=C77020, Manufacturer=Murata, Max Operating Temperature=125°C, Min Operating Temperature=-55°C, Package Quantity=10000, Tolerance=10%, Voltage=50V, Case/Package=0402, ComponentLink1Description=http://www.farnell.com/datasheets/2079156.pdf?src-supplier=Farnell, ComponentLink1URL=http://www.farnell.com/datasheets/2079156.pdf?src-supplier=Farnell, ComponentLink2Description=http://www.mouser.com/ds/2/281/c02e-2905.pdf?src-supplier=Mouser, ComponentLink2URL=http://www.mouser.com/ds/2/281/c02e-2905.pdf?src-supplier=Mouser, ComponentLink3Description=https://datasheet.octopart.com/GRM155R71H104KE14D-Murata-datasheet-22122223.pdf?src-supplier=Future+Electronics, ComponentLink3URL=https://datasheet.octopart.com/GRM155R71H104KE14D-Murata-datasheet-22122223.pdf?src-supplier=Future+Electronics, ComponentLink4Description=http://www.farnell.com/datasheets/2079156.pdf?src-supplier=Newark, ComponentLink4URL=http://www.farnell.com/datasheets/2079156.pdf?src-supplier=Newark, ComponentLink5Description=https://datasheet.octopart.com/GRM155R71H104KE14D-Murata-datasheet-66077078.pdf?src-supplier=Element14, ComponentLink5URL=https://datasheet.octopart.com/GRM155R71H104KE14D-Murata-datasheet-66077078.pdf?src-supplier=Element14, ComponentLink6Description=https://search.murata.co.jp/Ceramy/image/img/A01X/G101/ENG/GRM155R71H104KE14-01.pdf?src-supplier=Digikey, ComponentLink6URL=https://search.murata.co.jp/Ceramy/image/img/A01X/G101/ENG/GRM155R71H104KE14-01.pdf?src-supplier=Digikey, Construction=Flat, Depth=0.5mm, Dissipation Factor=0.025%, Height=0.5mm, Item Type=Capacitors, Lead Free=5697LeadFree, Length=1mm, Manufacturer Part Number=GRM155R71H104KE14D, Material=Ceramic, Mounting Technology="Surface Mount", Packaging="Tape and Reel", Pins=2NUMBER, Pricing="10000=0.0034, 40000=0.0033, 150000=0.0032, 250000=0.0031, 500000=0.003 (USD)", Reach SVHC Compliant=No, RoHS=Yes, RoHS Compliant=Yes, Series=GRM, Stock=45820000, Supplier="Future Electronics", Termination=SMD/SMT, Thickness=0.022inch, Voltage Rating=50V, Voltage Rating (DC)=50V, Weight=0.000212oz, Width=0.5mm
C14: library part KNTC0603/100KF3950, "100kΩ 100uA 100mW 3950K ±1% 0603 NTC Thermistors ROHS", LCSC Part Number=C2892545, Manufacturer=KUU, Package=0603, ComponentLink1Description=LCSC, ComponentLink1URL=https://lcsc.com/product-detail/NTC-Thermistors_KUU-KNTC0603-100KF3950_C2892545.html, Item Type="NTC Thermistor", Manufacturer Part Number=KNTC0603/100KF3950
C16 C39 C42: library part GRM155R61E225KE11D, "CAP CER 2.2UF 25V X5R 0402", Case Code (Imperial)=0402, Case Code (Metric)=1005, Dielectric=X5R, LCSC Part Number=C385032, Manufacturer=Murata, Max Operating Temperature=85°C, Min Operating Temperature=-55°C, Package Quantity=10000, Resistor Type=Ceramic, Tolerance=10%, Voltage Rating=25V, Capacitance=2.2uF, Case/Package=0402, Category="Ceramic Capacitors", ComponentLink1Description=http://www.mouser.com/ds/2/281/c02e-2905.pdf?src-supplier=Mouser, ComponentLink1URL=http://www.mouser.com/ds/2/281/c02e-2905.pdf?src-supplier=Mouser, ComponentLink2Description=http://search.murata.co.jp/Ceramy/image/img/A01X/G101/ENG/GRM155R61E225KE11-01.pdf?src-supplier=Digi-Key, ComponentLink2URL=http://search.murata.co.jp/Ceramy/image/img/A01X/G101/ENG/GRM155R61E225KE11-01.pdf?src-supplier=Digi-Key, ComponentLink3Description=http://search.murata.co.jp/Ceramy/image/img/A01X/partnumbering_e_01.pdf?src-supplier=Digi-Key, ComponentLink3URL=http://search.murata.co.jp/Ceramy/image/img/A01X/partnumbering_e_01.pdf?src-supplier=Digi-Key, ComponentLink4Description=http://psearch.en.murata.com/capacitor/product/GRM155R61E225KE11%23.pdf?src-supplier=Avnet, ComponentLink4URL=http://psearch.en.murata.com/capacitor/product/GRM155R61E225KE11%23.pdf?src-supplier=Avnet, Height=0.5mm, Item Type=Capacitor, Lead Free="Lead Free", Length=1mm, Manufacturer Part Number=GRM155R61E225KE11D, Material=Ceramic, Mount="Surface Mount", Packaging="Tape and Reel", Pricing 1="10000=0.03830, 20000=0.03623, 40000=0.03416, 60000=0.03209, 80000=0.03002, 100000=0.02795, 1000000=0.02588 (USD)", RoHS=Yes, RoHS Compliant=Yes, Stock 1=210000, Supplier 1=Avnet, Supplier Part Number 1=GRM155R61E225KE11D, Termination=SMD/SMT, Thickness=0.022inch, Voltage Rating (DC)=25V, Weight=0.000212oz, Width=0.5mm
C18: library part CC0402KRX5R6BB475, "CAP CER 4.7UF 10V X5R 0402", Case Code (Imperial)=0402, Case Code (Metric)=1005, LCSC Part Number=C326586, Manufacturer=Yageo, Max Operating Temperature=85°C, Min Operating Temperature=-55°C, Supplier Part Number 1=3871698, Tolerance=10%, Voltage Rating=10V, Capacitance=4.7uF, Case/Package=0402, Category="Ceramic Capacitors", ComponentLink1Description=http://www.yageo.com/documents/recent/UPY-GPHC_X5R_4V-to-50V_25.pdf?src-supplier=Digi-Key, ComponentLink1URL=http://www.yageo.com/documents/recent/UPY-GPHC_X5R_4V-to-50V_25.pdf?src-supplier=Digi-Key, Manufacturer Part Number=CC0402KRX5R6BB475, Mount="Surface Mount", Packaging="Cut Tape", Pricing 1="10000=0.02310, 50000=0.02100 (GBP)", RoHS=Yes, RoHS Compliant=Yes, Stock 1=20000, Supplier 1=Farnell
C19: library part CC0603MRX5R6BB226, "CAP CER 22UF 10V X5R 0603", Case Code (Imperial)=0603, Case Code (Metric)=1608, Dielectric=X5R, LCSC Part Number=C109447, Manufacturer=Yageo, Max Operating Temperature=85°C, Min Operating Temperature=-55°C, Package Quantity=4000, Supplier Part Number 1=311-1819-1-ND, Tolerance=20%, Voltage Rating=10V, Capacitance=22uF, Case/Package=0603, Category="Ceramic Capacitors", ComponentLink1Description=http://www.mouser.com/ds/2/447/Yageo_UPY-GP_NP0_16V-to-50V_9-358835.pdf?src-supplier=Mouser, ComponentLink1URL=http://www.mouser.com/ds/2/447/Yageo_UPY-GP_NP0_16V-to-50V_9-358835.pdf?src-supplier=Mouser, ComponentLink2Description=http://www.yageo.com/documents/recent/UPY-GPHC_X5R_4V-to-50V_25.pdf?src-supplier=Digi-Key, ComponentLink2URL=http://www.yageo.com/documents/recent/UPY-GPHC_X5R_4V-to-50V_25.pdf?src-supplier=Digi-Key, Halogen Free="Halogen Free", Height=0.8mm, Item Type=Capacitor, Lead Free="Lead Free", Length=0.063inch, Manufacturer Part Number=CC0603MRX5R6BB226, Mount="Surface Mount", Packaging="Tape and Reel", Pricing 1="1=0.68000, 10=0.48000, 50=0.36300, 100=0.31610, 500=0.23416, 1000=0.19903 (USD)", RoHS=Yes, RoHS Compliant=Yes, Stock 1=19628, Supplier 1=Digi-Key, Termination=SMD/SMT, Thickness=0.035inch, Voltage Rating (DC)=10V, Weight=7.1E-05oz, Width=0.8mm
C29 C31 C32 C34 C37 C41: library part CC0402MRX5R6BB106, "CAP CER 10UF 10V X5R 0402", Case Code (Imperial)=0402, Case Code (Metric)=1005, LCSC Part Number=C962143, Manufacturer=Yageo, Max Operating Temperature=85°C, Min Operating Temperature=-55°C, Supplier Part Number 1=6097631, Tolerance=20%, Voltage Rating=10V, Capacitance=10uF, Case/Package=0402, Category="Ceramic Capacitors", ComponentLink1Description=http://www.yageo.com/documents/recent/UPY-GPHC_X5R_4V-to-50V_25.pdf?src-supplier=Digi-Key, ComponentLink1URL=http://www.yageo.com/documents/recent/UPY-GPHC_X5R_4V-to-50V_25.pdf?src-supplier=Digi-Key, Item Type=Capacitor, Manufacturer Part Number=CC0402MRX5R6BB106, Mount="Surface Mount", Packaging="Tape and Reel", Pricing 1="10000=0.02650, 20000=0.02590, 30000=0.02550, 40000=0.02530, 50000=0.02450 (USD)", RoHS=Yes, RoHS Compliant=Yes, Stock 1=80000, Supplier 1="Future Electronics"
D1: "DIODE SCHOTTKY 40V 1A SOD123", Average Rectified Current=1A, Capacitance=110pF, Case/Package=SOD-123-2, Forward Voltage=450mV, LCSC Part Number=C82544, Manufacturer=Diodes, Max Forward Surge Current (Ifsm)=25A, Max Operating Temperature=125°C, Max Power Dissipation=450mW, Max Repetitive Reverse Voltage (Vrrm)=40V, Max Reverse Current=50uA, Min Operating Temperature=-65°C, Package Quantity=3000, Supplier Part Number 1=1N5819HW-FDICT-ND, Category="Schottky Diodes", ComponentLink1Description=https://datasheet.ciiva.com/16303/ds30217-16303296.pdf?src-supplier=Future+Electronics, ComponentLink1URL=https://datasheet.ciiva.com/16303/ds30217-16303296.pdf?src-supplier=Future+Electronics, ComponentLink2Description=https://datasheet.ciiva.com/27092/1538419-27092484.pdf?src-supplier=Jameco, ComponentLink2URL=https://datasheet.ciiva.com/27092/1538419-27092484.pdf?src-supplier=Jameco, ComponentLink3Description=https://datasheet.ciiva.com/912/ds30217-912801.pdf?src-supplier=Digi-Key, ComponentLink3URL=https://datasheet.ciiva.com/912/ds30217-912801.pdf?src-supplier=Digi-Key, ComponentLink4Description=https://datasheet.ciiva.com/1177/ds30217-1177089.pdf?src-supplier=Element14, ComponentLink4URL=https://datasheet.ciiva.com/1177/ds30217-1177089.pdf?src-supplier=Element14, ComponentLink5Description=https://datasheet.ciiva.com/912/ds30217-912802.pdf?src-supplier=Digi-Key, ComponentLink5URL=https://datasheet.ciiva.com/912/ds30217-912802.pdf?src-supplier=Digi-Key, ComponentLink6Description=https://datasheet.ciiva.com/912/ds30217-912803.pdf?src-supplier=Digi-Key, ComponentLink6URL=https://datasheet.ciiva.com/912/ds30217-912803.pdf?src-supplier=Digi-Key, ComponentLink7Description=https://datasheet.ciiva.com/8303/ds30217-8303132.pdf?src-supplier=Avnet, ComponentLink7URL=https://datasheet.ciiva.com/8303/ds30217-8303132.pdf?src-supplier=Avnet, ComponentLink8Description=https://datasheet.ciiva.com/25919/ds30217-25919644.pdf?src-supplier=Avnet+Europe, ComponentLink8URL=https://datasheet.ciiva.com/25919/ds30217-25919644.pdf?src-supplier=Avnet+Europe, Contact Plating=Tin,Matte, Current Rating=1A, Element Configuration=Single, Forward Current=1A, Height=1.25mm, Item Type=Diode, Lead Free="Lead Free", Length=2.85mm, Manufacturer Part Number=1N5819HW-7-F, Max Reverse Voltage (DC)=40V, Number of Pins=2, Output Current=1A, Packaging="Tape and Reel", Peak Non-Repetitive Surge Current=25A, Polarity=Standard, Pricing 1="1=0.46000, 10=0.34500, 100=0.19530, 500=0.12936, 1000=0.09918 (USD)", Radiation Hardening=No, REACH SVHC="No SVHC", RoHS=Yes, RoHS Compliant=Yes, Series=-, Supplier 1=Digi-Key, Termination=SMD/SMT, Voltage Rating (DC)=40V, Weight=0.000353oz, Width=1.7mm
FB1: "FERRITE BEAD 220 OHM 0603 1LN", Case Code (Imperial)=0603, Case Code (Metric)=1608, Current Rating=1.4A, DC Resistance (DCR)=100mR, ESR (Equivalent Series Resistance)=220R, LCSC Part Number=C80165, Manufacturer=Murata, Manufacturer Series=BLM18P, Max Operating Temperature=125°C, Min Operating Temperature=-55°C, Package Quantity=1, Test Frequency=100MHz, Tolerance=25%, Case/Package=0603, Channels=1, ComponentLink1Description=https://datasheet.ciiva.com/19458/1845030-19458417.pdf?src-supplier=Jameco, ComponentLink1URL=https://datasheet.ciiva.com/19458/1845030-19458417.pdf?src-supplier=Jameco, ComponentLink2Description=https://datasheet.ciiva.com/11800/0900766b81275ca5-11800851.pdf?src-supplier=Rs, ComponentLink2URL=https://datasheet.ciiva.com/11800/0900766b81275ca5-11800851.pdf?src-supplier=Rs, ComponentLink3Description=https://datasheet.ciiva.com/29347/442391-da-01-en-chip-drossel-0603-220r-1400ma-1-6x0-8mm-29347986.pdf?src-supplier=Conrad, ComponentLink3URL=https://datasheet.ciiva.com/29347/442391-da-01-en-chip-drossel-0603-220r-1400ma-1-6x0-8mm-29347986.pdf?src-supplier=Conrad, ComponentLink4Description=https://datasheet.ciiva.com/8021/5148-8021482.pdf?src-supplier=Element14, ComponentLink4URL=https://datasheet.ciiva.com/8021/5148-8021482.pdf?src-supplier=Element14, ComponentLink5Description=https://datasheet.ciiva.com/8021/5148-8021479.pdf?src-supplier=Element14, ComponentLink5URL=https://datasheet.ciiva.com/8021/5148-8021479.pdf?src-supplier=Element14, ComponentLink6Description=https://datasheet.ciiva.com/14122/blm-series-eng-tds-14122909.pdf?src-supplier=Distrelec, ComponentLink6URL=https://datasheet.ciiva.com/14122/blm-series-eng-tds-14122909.pdf?src-supplier=Distrelec, ComponentLink7Description=https://datasheet.ciiva.com/1012/l0110s0100blm18p-1012162.pdf?src-supplier=Digikey, ComponentLink7URL=https://datasheet.ciiva.com/1012/l0110s0100blm18p-1012162.pdf?src-supplier=Digikey, ComponentLink8Description=https://datasheet.ciiva.com/1012/l0110s0100blm18p-1012161.pdf?src-supplier=Digikey, ComponentLink8URL=https://datasheet.ciiva.com/1012/l0110s0100blm18p-1012161.pdf?src-supplier=Digikey, ComponentLink9Description=https://datasheet.ciiva.com/1012/l0110s0100blm18p-1012163.pdf?src-supplier=Digikey, ComponentLink9URL=https://datasheet.ciiva.com/1012/l0110s0100blm18p-1012163.pdf?src-supplier=Digikey, ComponentLink10Description=https://datasheet.ciiva.com/3081/l0110s0100blm18p-3081633.pdf?src-supplier=Avnet, ComponentLink10URL=https://datasheet.ciiva.com/3081/l0110s0100blm18p-3081633.pdf?src-supplier=Avnet, ComponentLink11Description=https://datasheet.ciiva.com/16205/l0110s0100blm18p-16205422.pdf?src-supplier=Future+Electronics, ComponentLink11URL=https://datasheet.ciiva.com/16205/l0110s0100blm18p-16205422.pdf?src-supplier=Future+Electronics, Core Material=Ferrite, DC Current=1.4A, DC Resistance-Max=100mR, Depth=0.8mm, ESR=100mR, Height=0.8mm, Impedance=220R, Item Type="Ferrite Bead", Lead Free="Lead Free", Length=1.6mm, Manufacturer Part Number=BLM18PG221SN1D, Material=Steel,Ferrite, Max Current Rating=1.4A, Max DC Current=1.4A, Number of Circuits=1, Number of Lines=1, Packaging="Tape and Reel", Pins=2, Pricing="1=0.1, 10=0.078, 25=0.0712, 50=0.064, 100=0.0469, 250=0.03412, 500=0.03128, 1000=0.02701 (USD)", Radiation Hardening=No, Reach SVHC Compliant=No, RMS Current (Irms)=1.4A, RoHS=Yes, RoHS Compliant=Yes, Series=BLM18P, Shielding=Unshielded, Stock=134052, Supplier=Digikey, Termination=SMD/SMT, Weight=7.1E-05oz, Width=0.8mm
J1: "5A 1 16P Female Type-C SMD USB Connectors ROHS", LCSC Part Number=C165948, Manufacturer="Korean Hroparts Elec", ComponentLink1Description=LCSC, ComponentLink1URL=https://www.lcsc.com/product-detail/USB-Connectors_Korean-Hroparts-Elec-TYPE-C-31-M-12_C165948.html, Item Type="USB Connector", Manufacturer Part Number=TYPE-C-31-M-12
J2: library part C145963, "1x6P SH 1 1mm 6 SMD,P=1mm Wire To Board / Wire To Wire Connector ROHS", Manufacturer=BOOMELE, Package=SMD,P=1mm, ComponentLink1Description=LCSC, ComponentLink1URL=https://www.lcsc.com/product-detail/Wire-To-Board-Wire-To-Wire-Connector_BOOMELE-Boom-Precision-Elec-C145963_C145963.html, Item Type=Connector, LCSC Part Number=C145963, Manufacturer Part Number=C145963
J3: "Gold 250V 3A Policy 2.5mm 6P -40℃~+105℃ 2.54mm Single Row Black Brass 2.54mm 1x6P SMD,P=2.54mm Pin Headers ROHS", LCSC Part Number=C780061, Manufacturer="XKB Connectivity", Manufacturer Part Number=X6511WVS-03H-C60D48R1, Package=SMD,P=2.54mm, ComponentLink1Description=LCSC, ComponentLink1URL=https://www.lcsc.com/product-detail/Pin-Headers_XKB-Connectivity-X6511WVS-03H-C60D48R1_C780061.html, Item Type="Male Header"
J4: "-25℃~+80℃ 3.5mm Headphone Jack 30V 1A SMD Audio Connectors ROHS", LCSC Part Number=C2848643, Manufacturer="Korean Hroparts Elec", Package=SMD, ComponentLink1Description=LCSC, ComponentLink1URL=https://lcsc.com/product-detail/Audio-Connectors_Korean-Hroparts-Elec-PJ-332A-6A_C2848643.html?s_z=n_PJ332A, Item Type="Audio Connector", Manufacturer Part Number=PJ-332A-6A
L1: library part YX-A11-R501000-R0807, "Transmitter 6.3uH 75mΩ ±5% Wireless Charging Coils ROHS", LCSC Part Number=C424427, Manufacturer=CND-tek, Package=-, ComponentLink1Description=LCSC, ComponentLink1URL=https://lcsc.com/product-detail/Wireless-Charging-Coils_CND-tek-YX-A11-R501000-R0807_C424427.html, Item Type="Wireless Charging Coil", Manufacturer Part Number=YX-A11-R501000-R0807
L2: "FERRITE BEAD 600 OHM 0402 1LN", Case Code (Imperial)=0402, Case Code (Metric)=1005, Current Rating=300mA, DC Resistance (DCR)=520mR, DC Resistance-Max=600mR, Frequency=100MHz, LCSC Part Number=C76884, Manufacturer=Murata, Max Operating Temperature=125°C, Min Operating Temperature=-55°C, Package Quantity=10000, Supplier Part Number 1=490-1006-1-ND, Tolerance=25%, Case/Package=0402, Category=Inductors, ComponentLink1Description=https://datasheet.ciiva.com/11799/0900766b811b5866-11799226.pdf?src-supplier=RSComponents, ComponentLink1URL=https://datasheet.ciiva.com/11799/0900766b811b5866-11799226.pdf?src-supplier=RSComponents, ComponentLink2Description=https://datasheet.ciiva.com/41449/001172163-da-01-en-drossel-0402-600r-1-0x0-5mm-10000st-41449450.pdf?src-supplier=Conrad, ComponentLink2URL=https://datasheet.ciiva.com/41449/001172163-da-01-en-drossel-0402-600r-1-0x0-5mm-10000st-41449450.pdf?src-supplier=Conrad, ComponentLink3Description=https://datasheet.ciiva.com/29347/442210-da-01-en-chip-drossel-0402-600r-300ma-1-0x0-5mm-29347879.pdf?src-supplier=Conrad, ComponentLink3URL=https://datasheet.ciiva.com/29347/442210-da-01-en-chip-drossel-0402-600r-300ma-1-0x0-5mm-29347879.pdf?src-supplier=Conrad, ComponentLink4Description=https://datasheet.ciiva.com/1466/5144-1466744.pdf?src-supplier=Element14, ComponentLink4URL=https://datasheet.ciiva.com/1466/5144-1466744.pdf?src-supplier=Element14, ComponentLink5Description=https://datasheet.ciiva.com/1466/5144-1466745.pdf?src-supplier=Element14, ComponentLink5URL=https://datasheet.ciiva.com/1466/5144-1466745.pdf?src-supplier=Element14, ComponentLink6Description=https://datasheet.ciiva.com/14122/blm-series-eng-tds-14122894.pdf?src-supplier=Distrelec, ComponentLink6URL=https://datasheet.ciiva.com/14122/blm-series-eng-tds-14122894.pdf?src-supplier=Distrelec, ComponentLink7Description=https://datasheet.ciiva.com/6212/l0110s0100blm15ag-sn-6212519.pdf?src-supplier=Digi-Key, ComponentLink7URL=https://datasheet.ciiva.com/6212/l0110s0100blm15ag-sn-6212519.pdf?src-supplier=Digi-Key, ComponentLink8Description=https://datasheet.ciiva.com/6212/l0110s0100blm15ag-sn-6212565.pdf?src-supplier=Digi-Key, ComponentLink8URL=https://datasheet.ciiva.com/6212/l0110s0100blm15ag-sn-6212565.pdf?src-supplier=Digi-Key, ComponentLink9Description=https://datasheet.ciiva.com/6212/l0110s0100blm15ag-sn-6212520.pdf?src-supplier=Digi-Key, ComponentLink9URL=https://datasheet.ciiva.com/6212/l0110s0100blm15ag-sn-6212520.pdf?src-supplier=Digi-Key, ComponentLink10Description=https://datasheet.ciiva.com/8084/l0110s0100blm15ag-sn-8084271.pdf?src-supplier=Avnet, ComponentLink10URL=https://datasheet.ciiva.com/8084/l0110s0100blm15ag-sn-8084271.pdf?src-supplier=Avnet, ComponentLink11Description=https://datasheet.ciiva.com/8510/l0110s0100blm15ag-sn-8510909.pdf?src-supplier=Avnet, ComponentLink11URL=https://datasheet.ciiva.com/8510/l0110s0100blm15ag-sn-8510909.pdf?src-supplier=Avnet, Core Material=Ferrite, DC Current=300mA, Depth=0.55mm, Height=0.5mm, Impedance=600R, Item Type="Ferrite Bead", Lead Free="Lead Free", Length=1mm, Manufacturer Part Number=BLM15AG601SN1D, Material=Steel,Ferrite, Max Current Rating=300mA, Max DC Current=300mA, Military Standard=Not, Number of Circuits=1, Number of Lines=1, Number of Pins=2, Packaging="Tape and Reel", Pricing 1="1=0.10000, 10=0.06500, 25=0.05760, 50=0.05240, 100=0.04710, 250=0.03456, 500=0.02514, 1000=0.02461, 5000=0.01676 (USD)", Radiation Hardening=No, REACH SVHC="No SVHC", RoHS=Yes, RoHS Compliant=Yes, Series=BLM15AG_SN, Shielding=Unshielded, Stock 1=4108655, Supplier 1=Digi-Key, Termination=SMD/SMT, Test Frequency=100MHz, Width=0.5mm
LED1: library part NCD0603R3, "RED LED 0603 Light Emitting Diodes", LCSC Part Number=C3151730, Manufacturer="Foshan NationStar Optoelectronics", Package=0603, ComponentLink1Description=LCSC, ComponentLink1URL=https://www.lcsc.com/product-detail/Light-Emitting-Diodes-LED_Foshan-NationStar-Optoelectronics-NCD0603R3_C3151730.html, Item Type=LED, Manufacturer Part Number=NCD0603R3
LED2: library part NCD0603G2, "Emerald 0603 Light Emitting Diodes (LED) ROHS", LCSC Part Number=C87326, Manufacturer="Foshan NationStar Optoelectronics", Package=0603, ComponentLink1Description=LCSC, ComponentLink1URL=https://www.lcsc.com/product-detail/Light-Emitting-Diodes-LED_Foshan-NationStar-Optoelectronics-NCD0603G2_C87326.html, Item Type=LED, Manufacturer Part Number=NCD0603G2
LED3: "Colorless transparent lens -40℃~+85℃ Positive Stick Red,Green 120° SMD-4P,3.5x2.8mm LED Indication - Discrete ROHS", LCSC Part Number=C5355456, Manufacturer=Amicc, Package=SMD-4P,3.5x2.8mm, ComponentLink1Description=LCSC, ComponentLink1URL=https://jlcpcb.com/partdetail/Amicc-A_SC6302R6AGHC_A032T/C5355456, Item Type=LED, Manufacturer Part Number=A-SC6302R6AGHC-A03-2T
Q1 Q2: "30V 5.8A 32mΩ@10V,5.8A 1.4W 1.4V@250uA N Channel SOT-23 MOSFETs ROHS", LCSC Part Number=C344010, Manufacturer=BORN, ComponentLink1Description=LCSC, ComponentLink1URL=https://www.lcsc.com/product-detail/MOSFETs_BORN-AO3400A_C344010.html, Item Type=Mosfet, Manufacturer Part Number=AO3400A